# Altium PCB LiPo Charger.pcbdoc
Units mm, origin at the board's own origin, x right, y up, seen from the top; angles counter-clockwise.
Board outline 34.77 x 51.65 mm, 2 copper layers (Top Layer, Bottom Layer); 46 components, 29 nets, 164 pads, 18 vias.
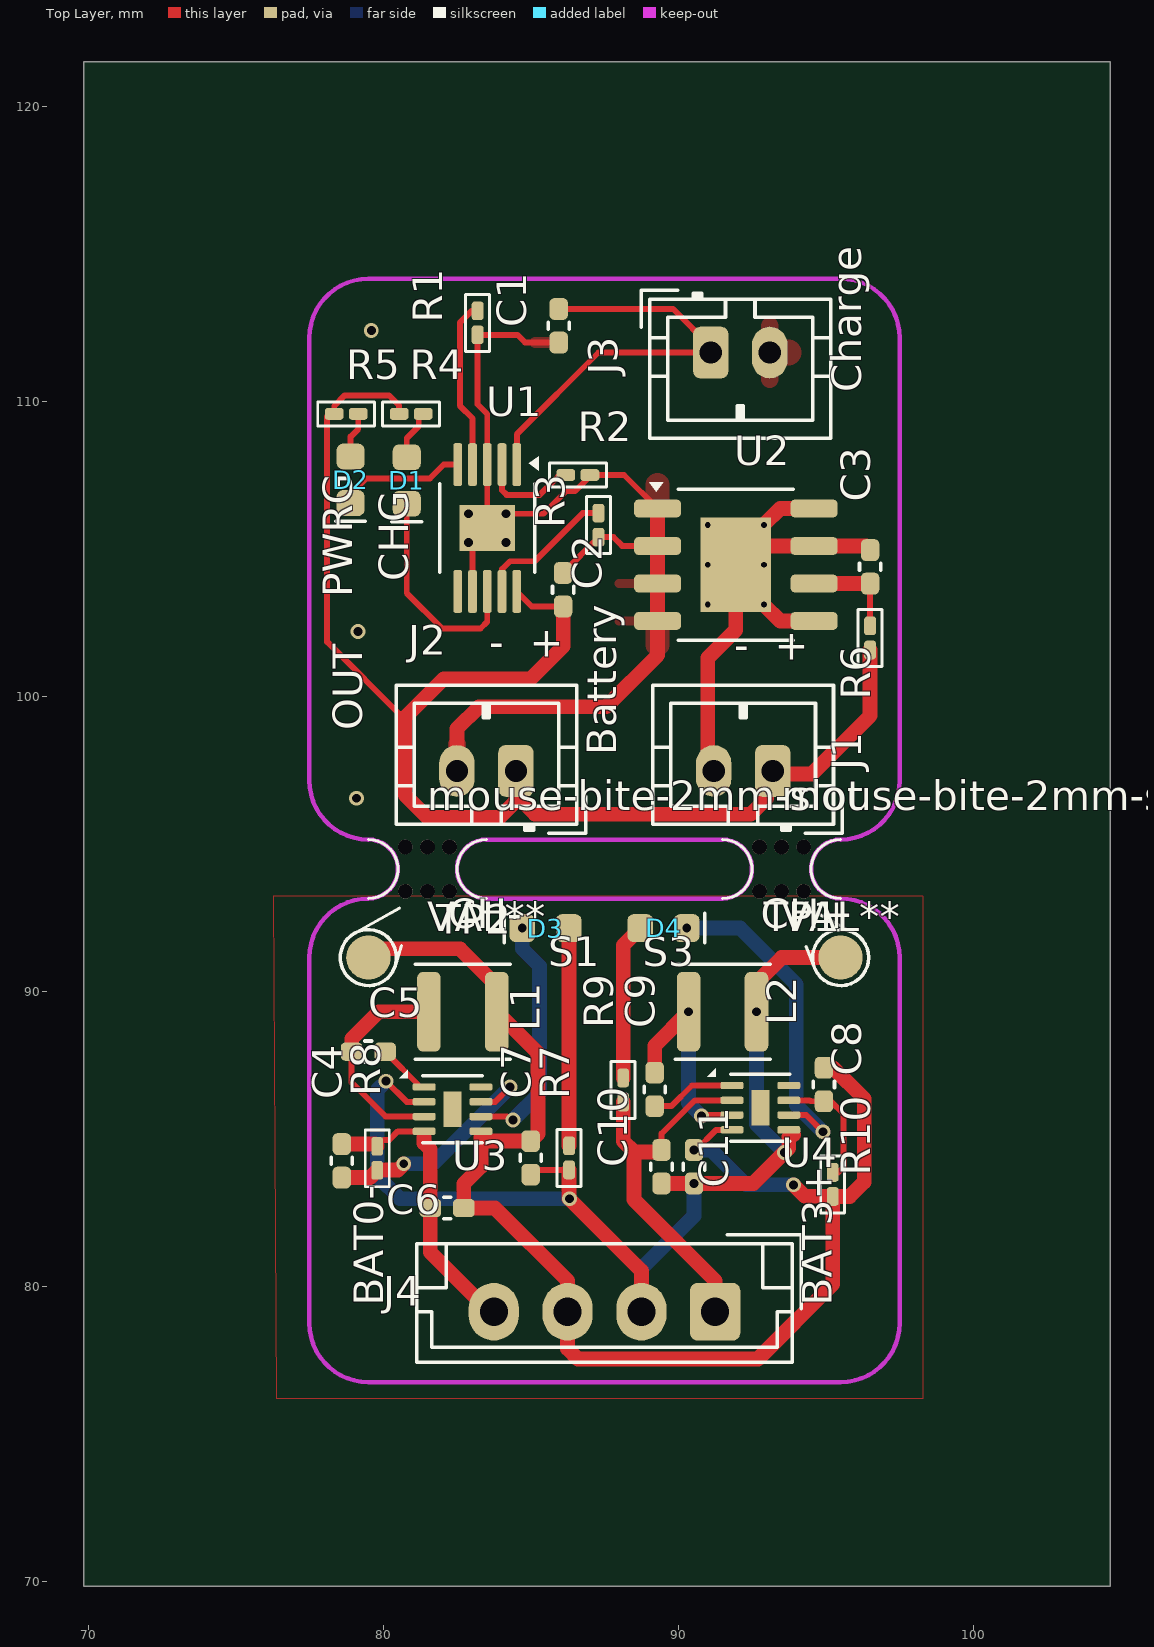
[diagram p0: Top Layer view]
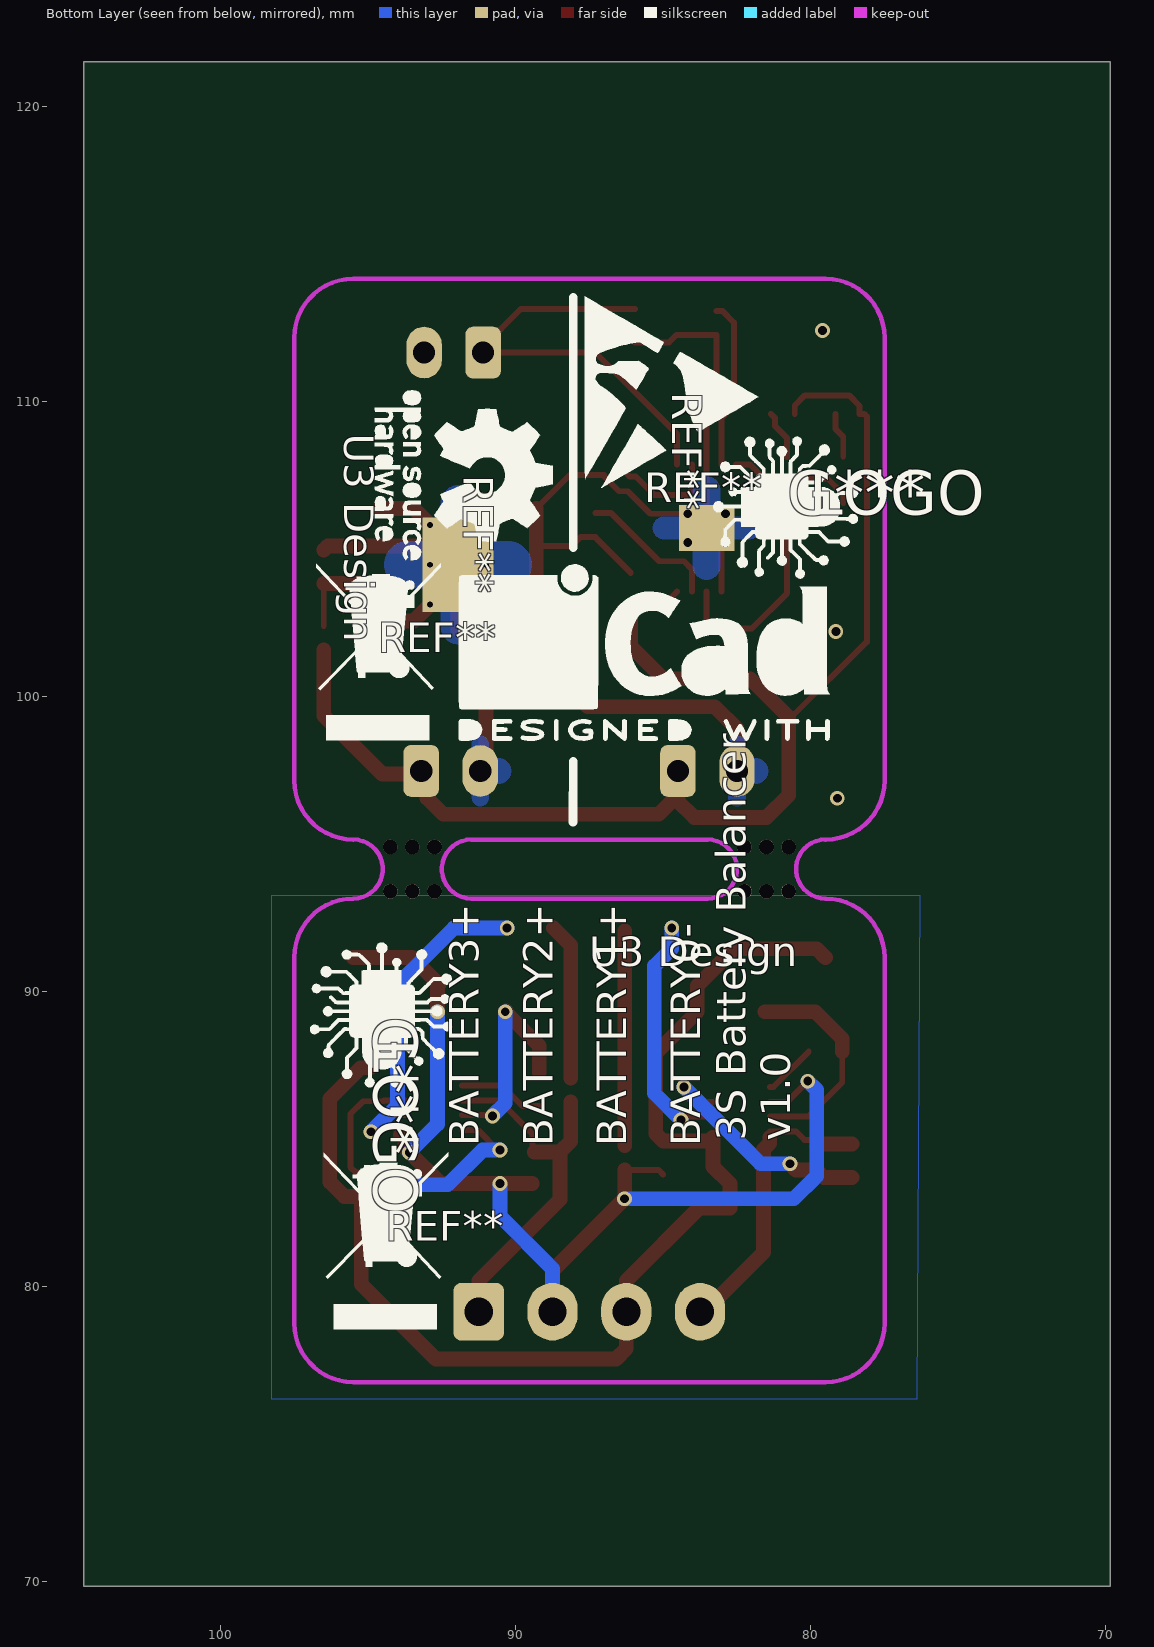
[diagram p1: Bottom Layer view, seen from below]

## Layer stack, top to bottom
Top Layer: signal copper (thickness not stored)
Dielectric: dielectric 0.32, FR-4, Dk 4.8
Bottom Layer: signal copper (thickness not stored)

## Board outline
104.62,69.85 69.85,69.85 69.85,121.497 104.62,121.497

## Design rules (kind name [scope] priority, off if disabled: settings)
BoardOutlineClearance safeClearance [All] p0: genericclearance=0.254 ignorepadtopadclearanceinfootprint=FALSE except(0: Track-CutoutEdge SMDPad-CutoutEdge THPad-CutoutEdge Via-CutoutEdge Fill-CutoutEdge Region-CutoutEdge Arc-SplitContinuation Track-SplitContinuation SMDPad-SplitContinuation THPad-SplitContinuation Via-SplitContinuation Fill-SplitContinuation Poly-SplitContinuation Region-SplitContinuation Text-SplitContinuation; 0.5: Track-OutlineEdge SMDPad-OutlineEdge THPad-OutlineEdge Via-OutlineEdge Fill-OutlineEdge Region-OutlineEdge Poly-OutlineEdge Text-OutlineEdge)
Clearance safeClearance [(InNet('GNDD') OR InNet('-BATT') OR InNet('+5V') OR InNet('+BATT') OR InNet('NET-(U2-VDD)') OR InNet('NET-(D1-A)') OR InNet('NET-(D1-K)') OR InNet('NET-(D2-K)') OR InNet('NET-(D2-A)') OR InNet('NET-(U1-PRETERM)') OR InNet('NET-(U1-ISET)') OR InNet('NET-(U1-TS)') OR InNet('NET-(U3-ISET)') OR InNet('NET-(J4-PIN_4)') OR InNet('NET-(U3-SW)') OR InNet('NET-(U3-BATC)') OR InNet('NET-(U4-ISET)') OR InNet('NET-(U4-BATC)') OR InNet('NET-(U4-SW)') OR InNet('NET-(J4-PIN_1)') OR InNet('NET-(D3-A)') OR InNet('NET-(D3-K)') OR InNet('NET-(D4-K)') OR InNet('NET-(D4-A)') OR InNet('NET-(J4-PIN_3)') OR InNet('NET-(J4-PIN_2)') OR InNet('UNCONNECTED-(U1-NC-PAD6)') OR InNet('UNCONNECTED-(U4-EN-PAD8)') OR InNet('UNCONNECTED-(U3-EN-PAD8)'))] p1: gap=0.178 ignorepadtopadclearanceinfootprint=FALSE except(0: Track-Track Track-SMDPad SMDPad-SMDPad Track-THPad SMDPad-THPad THPad-THPad Track-Via SMDPad-Via THPad-Via Via-Via Track-Fill SMDPad-Fill THPad-Fill Via-Fill Fill-Fill Track-Region SMDPad-Region THPad-Region Via-Region Fill-Region Region-Region Track-Poly SMDPad-Poly THPad-Poly Via-Poly Fill-Poly Region-Poly Poly-Poly Track-Text SMDPad-Text THPad-Text Via-Text Fill-Text Region-Text Poly-Text Text-Text Track-Hole SMDPad-Hole THPad-Hole Via-Hole Fill-Hole Region-Hole Poly-Hole Text-Hole; 0.5: Track-Sheet SMDPad-Sheet THPad-Sheet Via-Sheet Fill-Sheet Region-Sheet Poly-Sheet Text-Sheet Sheet-Hole)
DiffPairsRouting differentialPair [All] p1: maxuncoupledlength=10 minlimit=6 maxlimit=6 mostfreqgap=6 toplayer_minwidth=5 toplayer_prefwidth=10 toplayer_maxwidth=100 bottomlayer_minwidth=5 bottomlayer_prefwidth=10 bottomlayer_maxwidth=100
PasteMaskExpansion Common [All] p1: expansion=0
PlaneConnect innerPlane [All] p1: planeconnectstyle=Relief reliefexpansion=0.508 reliefentries=4 reliefconductorwidth=0.254 reliefairgap=0.254
PolygonConnect CopperRegion [All] p1: connectstyle=Relief reliefentries=4 reliefconductorwidth=0 polygonreliefangle="90 Angle" airgapwidth=19.685
PolygonConnect CopperRegion1 [All] p1: connectstyle=Relief reliefentries=4 reliefconductorwidth=0 polygonreliefangle="90 Angle" airgapwidth=19.685
PolygonConnect CopperRegion2 [All] p1: connectstyle=Relief reliefentries=4 reliefconductorwidth=0 polygonreliefangle="90 Angle" airgapwidth=19.685
RoutingVias viaSize [All] p1: viastyle="Through Hole" holewidth=12.0078 minholewidth=11.811 maxholewidth=236.2204 width=24.0158 minwidth=19.685 maxwidth=393.7008
SolderMaskExpansion Common [All] p1: useseparateexpansions=TRUE expansion=0 expansionbottom=0
Width trackWidth [All] p1: maxlimit=100 minlimit=5 preferedwidth=10

## Components (designator, comment, footprint, x,y, rotation, side; value= is the part's Value field where it differs from the comment)
C1 "10uF" Capacitor_SMD:C_0402_1005Metric_Pad0.74x0.62mm_HandSolder 85.94,112.555 r270 top
C2 "10uF" Capacitor_SMD:C_0402_1005Metric_Pad0.74x0.62mm_HandSolder 86.089,103.612 r90 top
C3 "10uF" Capacitor_SMD:C_0402_1005Metric_Pad0.74x0.62mm_HandSolder 96.49,104.387 r90 top
C4 "1nF" Capacitor_SMD:C_0402_1005Metric_Pad0.74x0.62mm_HandSolder 78.59,84.261 r90 top
C5 "10nF" Capacitor_SMD:C_0402_1005Metric_Pad0.74x0.62mm_HandSolder 79.49,87.961 r0 top
C6 "10uF" Capacitor_SMD:C_0402_1005Metric_Pad0.74x0.62mm_HandSolder 82.158,82.661 r0 top
C7 "10uF" Capacitor_SMD:C_0402_1005Metric_Pad0.74x0.62mm_HandSolder 84.99,84.361 r270 top
C8 "1nF" Capacitor_SMD:C_0402_1005Metric_Pad0.74x0.62mm_HandSolder 94.924,86.847 r90 top
C9 "10nF" Capacitor_SMD:C_0402_1005Metric_Pad0.74x0.62mm_HandSolder 89.19,86.679 r270 top
C10 "10uF" Capacitor_SMD:C_0402_1005Metric_Pad0.74x0.62mm_HandSolder 89.424,84.061 r90 top
C11 "10uF" Capacitor_SMD:C_0402_1005Metric_Pad0.74x0.62mm_HandSolder 90.524,84.061 r270 top
D1 "Red" SparkFun-LED:LED_0603_1608Metric_Red 80.79,107.312 r90 top
D2 "Green" SparkFun-LED:LED_0603_1608Metric_Green 78.89,107.334 r90 top
D3 "Red" SparkFun-LED:LED_0603_1608Metric_Red 85.49,92.147 r0 top
D4 "Red" SparkFun-LED:LED_0603_1608Metric_Red 89.49,92.147 r180 top
G*** "LOGO" LOGO 80.786,106.155 r180 bottom
G*** "LOGO" LOGO 94.79,89.147 r270 bottom
J1 "Battery_conn_in" Connector_JST:JST_PH_B2B-PH-K_1x02_P2.00mm_Vertical 93.19,97.471 r180 top
J2 "Battery_conn_out" Connector_JST:JST_PH_B2B-PH-K_1x02_P2.00mm_Vertical 84.49,97.471 r180 top
J3 "Charger_conn" Connector_JST:JST_PH_B2B-PH-K_1x02_P2.00mm_Vertical 91.09,111.647 r0 top
J4 "Conn_01x04_batteries" Connector_JST:JST_EH_B4B-EH-A_1x04_P2.50mm_Vertical 91.24,79.147 r180 top
L1 "1uH" Inductor_SMD:L_Sunlord_SWPA3010S 82.69,89.311 r0 top
L2 "1uH" Inductor_SMD:L_Sunlord_SWPA3010S 91.49,89.311 r0 top
mouse-bite-2mm-slot "VAL**" MouseBites:mouse-bite-2mm-slot 93.49,94.147 r0 top
mouse-bite-2mm-slot "VAL**" MouseBites:mouse-bite-2mm-slot 81.49,94.147 r0 top
R1 "1k" PCM_Resistor_SMD_AKL:R_0201_0603Metric_Pad0.64x0.40mm_HandSolder 83.19,112.654 r270 top
R2 "536R" PCM_Resistor_SMD_AKL:R_0201_0603Metric_Pad0.64x0.40mm_HandSolder 86.589,107.499 r0 top
R3 "10k" PCM_Resistor_SMD_AKL:R_0201_0603Metric_Pad0.64x0.40mm_HandSolder 87.289,105.799 r270 top
R4 "1k5" PCM_Resistor_SMD_AKL:R_0201_0603Metric_Pad0.64x0.40mm_HandSolder 80.94,109.57 r0 top
R5 "1k5" PCM_Resistor_SMD_AKL:R_0201_0603Metric_Pad0.64x0.40mm_HandSolder 78.74,109.57 r0 top
R6 "1k" PCM_Resistor_SMD_AKL:R_0201_0603Metric_Pad0.64x0.40mm_HandSolder 96.49,101.979 r270 top
R7 "1k5" PCM_Resistor_SMD_AKL:R_0201_0603Metric_Pad0.64x0.40mm_HandSolder 86.29,84.361 r90 top
R8 "51K" PCM_Resistor_SMD_AKL:R_0201_0603Metric_Pad0.64x0.40mm_HandSolder 79.79,84.347 r90 top
R9 "1k5" PCM_Resistor_SMD_AKL:R_0201_0603Metric_Pad0.64x0.40mm_HandSolder 88.124,86.661 r90 top
R10 "51K" PCM_Resistor_SMD_AKL:R_0201_0603Metric_Pad0.64x0.40mm_HandSolder 95.224,83.461 r270 top
REF** "KiCad-Logo2_5mm_SilkScreen" Symbol:KiCad-Logo2_5mm_SilkScreen 85.64,101.497 r180 bottom
REF** "WEEE-Logo_4.2x6mm_SilkScreen" Symbol:WEEE-Logo_4.2x6mm_SilkScreen 94.64,101.497 r180 bottom
REF** "WEEE-Logo_4.2x6mm_SilkScreen" Symbol:WEEE-Logo_4.2x6mm_SilkScreen 94.39,81.547 r180 bottom
REF** "OSHW-Logo_5.7x6mm_SilkScreen" Symbol:OSHW-Logo_5.7x6mm_SilkScreen 91.74,107.497 r270 bottom
REF** "ESD-Logo_6.6x6mm_SilkScreen" Symbol:ESD-Logo_6.6x6mm_SilkScreen 84.69,110.297 r270 bottom
TP1 "TestPoint" TestPoint:TestPoint_Pad_D1.5mm 95.49,91.147 r0 top
TP2 "TestPoint" TestPoint:TestPoint_Pad_D1.5mm 79.49,91.147 r0 top
U1 "BQ24090DGQ" Package_SO:HVSSOP-10-1EP_3x3mm_P0.5mm_EP1.57x1.88mm_ThermalVias 83.519,105.702 r270 top
U2 "XB8089D" Package_SO:HTSOP-8-1EP_3.9x4.9mm_P1.27mm_EP2.4x3.2mm_ThermalVias 91.94,104.458 r0 top
U3 "ETA3000" Package_DFN_QFN:DFN-8-1EP_2x2mm_P0.5mm_EP0.6x1.2mm 82.34,86.011 r0 top
U4 "ETA3000" Package_DFN_QFN:DFN-8-1EP_2x2mm_P0.5mm_EP0.6x1.2mm 92.774,86.061 r0 top

## Footprints (in the part's own frame and the unit in brackets; to place one, negate y for a bottom-side part, rotate by r counter-clockwise, add the part's x,y. Pads: shape width x height; smd on the part's side, far side on the other; paste and mask are expansions set on the pad)
Capacitor_SMD:C_0402_1005Metric_Pad0.74x0.62mm_HandSolder [mm]
  rrect50% 0.735x0.62 smd: 1(-0.567,0) 2(0.567,0)
  silkscreen extent -0.12,-0.36 0.12,0.36
Connector_JST:JST_EH_B4B-EH-A_1x04_P2.50mm_Vertical [mm]
  rrect29% 1.7x1.95 hole 0.95: 1(0,0)
  oval 1.7x1.95 hole 0.95: 2(2.5,0) 3(5,0) 4(7.5,0)
  silkscreen extent -2.91,-2.61 10.11,1.71
Connector_JST:JST_PH_B2B-PH-K_1x02_P2.00mm_Vertical [mm]
  rrect41% 1.2x1.75 hole 0.75: 1(0,0)
  oval 1.2x1.75 hole 0.75: 2(2,0)
  silkscreen extent -2.36,-2.91 4.06,2.11
Inductor_SMD:L_Sunlord_SWPA3010S [mm]
  rrect50% 0.8x2.7 smd: 1(-1.15,0) 2(1.15,0)
  silkscreen extent -1.61,-1.61 1.61,1.61
LOGO [mm]
  silkscreen extent -2.51,-2.17 2.4,2.65
MouseBites:mouse-bite-2mm-slot [mm]
  round 0.5 hole 0.5 unplated: ""(-0.75,-0.75) ""(-0.75,0.75) ""(0,-0.75) ""(0,0.75) ""(0.75,-0.75) ""(0.75,0.75)
  silkscreen extent -2,-1 2,1
Package_DFN_QFN:DFN-8-1EP_2x2mm_P0.5mm_EP0.6x1.2mm [mm]
  rrect50% 0.775x0.25 smd: 1(-0.962,0.75) 2(-0.962,0.25) 3(-0.962,-0.25) 4(-0.962,-0.75) 5(0.962,-0.75) 6(0.962,-0.25) 7(0.962,0.25) 8(0.962,0.75)
  rect 0.6x1.2 smd: 9(0,0)
  rrect50% 0.24x0.48 smd: ""(-0.15,-0.3) ""(-0.15,0.3) ""(0.15,-0.3) ""(0.15,0.3)
  silkscreen extent -1.8,-1.13 1,1.33
Package_SO:HTSOP-8-1EP_3.9x4.9mm_P1.27mm_EP2.4x3.2mm_ThermalVias [mm]
  rrect50% 1.6x0.6 smd: 1(-2.65,1.905) 2(-2.65,0.635) 3(-2.65,-0.635) 4(-2.65,-1.905) 5(2.65,-1.905) 6(2.65,-0.635) 7(2.65,0.635) 8(2.65,1.905)
  round 0.5 hole 0.2: 9(-0.95,-1.35) 9(-0.95,0) 9(-0.95,1.35) 9(0.95,-1.35) 9(0.95,0) 9(0.95,1.35)
  rect 2.4x3.2 smd: 9(0,0)
  rect 2.4x3.2 smd far side: 9(0,0)
  rrect50% 0.97x1.29 smd: ""(-0.6,-0.8) ""(-0.6,0.8) ""(0.6,-0.8) ""(0.6,0.8)
  silkscreen extent -2.94,-2.56 1.95,2.8
Package_SO:HVSSOP-10-1EP_3x3mm_P0.5mm_EP1.57x1.88mm_ThermalVias [mm]
  rrect50% 1.45x0.3 smd: 1(-2.15,1) 2(-2.15,0.5) 3(-2.15,0) 4(-2.15,-0.5) 5(-2.15,-1) 6(2.15,-1) 7(2.15,-0.5) 8(2.15,0) 9(2.15,0.5) 10(2.15,1)
  round 0.6 hole 0.3: 11(-0.485,0.64) 11(-0.485,-0.64) 11(0.485,0.64) 11(0.485,-0.64)
  rect 1.57x1.88 smd: 11(0,0)
  rect 1.57x1.88 smd far side: 11(0,0)
  rrect50% 0.63x0.76 smd: ""(-0.39,0.47) ""(-0.39,-0.47) ""(0.39,0.47) ""(0.39,-0.47)
  silkscreen extent -2.43,-1.61 1.5,1.74
PCM_Resistor_SMD_AKL:R_0201_0603Metric_Pad0.64x0.40mm_HandSolder [mm]
  rrect50% 0.635x0.4 smd: 1(-0.407,0) 2(0.407,0)
  rrect50% 0.458x0.36 smd: ""(-0.433,0) ""(0.433,0)
  silkscreen extent -0.97,-0.41 0.97,0.41
SparkFun-LED:LED_0603_1608Metric_Green [mm]
  rrect50% 0.875x0.95 smd: 1(-0.787,0) 2(0.787,0)
  silkscreen extent -1.4,-0.5 -1.4,0.5
SparkFun-LED:LED_0603_1608Metric_Red [mm]
  rrect50% 0.875x0.95 smd: 1(-0.787,0) 2(0.787,0)
  silkscreen extent -1.4,-0.5 -1.4,0.5
Symbol:ESD-Logo_6.6x6mm_SilkScreen [mm]
  silkscreen extent -3.25,-2.96 3.23,2.93
Symbol:KiCad-Logo2_5mm_SilkScreen [mm]
  silkscreen extent -6.28,-3 6.29,2.98
Symbol:OSHW-Logo_5.7x6mm_SilkScreen [mm]
  silkscreen extent -2.87,-3.02 2.88,3.01
Symbol:WEEE-Logo_4.2x6mm_SilkScreen [mm]
  silkscreen extent -2.11,-2.99 2.12,3.01
TestPoint:TestPoint_Pad_D1.5mm [mm]
  round 1.5 smd: 1(0,0)
  silkscreen extent -0.95,-0.95 0.95,0.95

## Via types
v1: diameter 0.5, hole 0.3, Top Layer to Bottom Layer, 18 vias

## Nets (pads, with @x,y where several pads share a name; then routed paths per layer and width w, separated by ;. In a path a pad name is that pad's centre, name@x,y a point inside that pad or via, vN(x,y) a via of type N, cw(c..) or ccw(c..) an arc to the next point about the centre after c; other vN are vias at no path point)
+5V: C1.1 J3.1 U1.1 | length 14.6
  Top Layer w0.2: U1.1 84.519,108.876 87.29,111.647 J3.1 91.09,111.847 89.815,113.122 C1.1
+BATT: C2.1 J1.1 J2.1 R4.1 R5.1 R6.2 U1.10 | length 49.3
  Top Layer w0.2: R4.1 80.532,109.854 80.19,110.197 78.69,110.197 78.332,109.839 R5.1 78.183,109.57 78.091,109.478 78.091,101.846 80.64,99.297 80.74,99.297 ; U1.10 85.027,103.044 C2.1
  Top Layer w0.5: C2.1 86.089,101.696 84.99,100.597 82.04,100.597 80.74,99.297 80.74,96.647 81.489,95.898 83.941,95.898 84.49,96.447 J2.1 84.49,96.65 85.139,96.001 92.446,96.001 92.99,96.545 92.99,97.271 J1.1 93.294,97.368 94.511,97.368 96.49,99.347 R6.2
-BATT: C3.2 J1.2 U2.5 U2.7 U2.8 U2.9 | length 16.2
  Top Layer w0.5: J1.2 90.99,97.671 90.99,101.297 91.94,102.247 91.94,104.458 92.575,105.093 U2.7 96.352,105.093 C3.2 ; U2.9@92.89,103.108 93.445,102.553 U2.5 ; U2.9@92.89,105.808 93.445,106.363 U2.8
GNDD: C1.2 C2.2 J2.2 J3.2 R1.2 R2.2 R3.2 U1.3 U1.7 U1.11 U2.1 U2.2 U2.3 U2.4 | length 36.1
  Top Layer w0.2: U1.7 83.019,105.077 83.519,105.577 83.519,105.702 U1.3 83.519,109.568 83.19,109.897 R1.2 84.54,112.247 84.8,111.987 C1.2 ; U1.11@84.159,106.187 85.427,106.187 86.189,106.949 86.489,106.949 86.997,107.457 R2.2 88.154,107.499 U2.1 ; C2.2 86.089,104.192 R3.2 87.796,105.392 88.09,105.097 89.286,105.097 U2.2
  Top Layer w0.5: J2.2 82.49,98.897 83.24,99.647 87.54,99.647 89.29,101.397 U2.4 U2.1
  other v1: 79.09,96.547 79.14,102.197 79.59,112.397
NET-(D1-A): D1.2 R4.2 | length 1.7
  Top Layer w0.2: D1.2 80.79,108.747 81.198,109.154 81.198,109.42 R4.2
NET-(D1-K): D1.1 U1.8 | length 7.4
  Top Layer w0.2: D1.1 80.79,103.497 81.99,102.297 83.29,102.297 83.519,102.526 U1.8
NET-(D2-A): D2.2 R5.2 | length 1.6
  Top Layer w0.2: D2.2 78.89,108.797 79.147,109.054 R5.2
NET-(D2-K): D2.1 U1.5 | length 4.3
  Top Layer w0.2: D2.1 78.89,106.847 79.424,107.381 81.574,107.381 82.045,107.852 U1.5
NET-(D3-A): D3.2 R7.2 | length 7.4
  Top Layer w0.2: D3.2 86.278,92.072 D3.2@86.29,92.059
  Top Layer w0.5: R7.2 D3.2@86.29,92.059
NET-(D3-K): D3.1 U3.6 | length 8.3
  Top Layer w0.2: U3.6 84.19,85.761 84.304,85.647 v1(84.39,85.647)
  Bottom Layer w0.5: v1(84.39,85.647) 85.29,86.547 85.29,90.859 84.703,91.447 v1(84.703,92.147)
NET-(D4-A): D4.2 R9.2 | length 5.3
  Top Layer w0.5: R9.2 88.124,91.568 D4.2
NET-(D4-K): D4.1 U4.6 | length 11.3
  Top Layer w0.2: U4.6 94.326,85.811 v1(94.89,85.247)
  Bottom Layer w0.5: v1(90.278,92.147) 92.09,92.147 93.99,90.247 93.99,86.147 v1(94.89,85.247)
NET-(J4-PIN_1): C10.2 J4.1 R9.1 U4.2 | length 12.8
  Top Layer w0.2: C10.2@89.356,84.561 C10.2 89.424,85.18 90.555,86.311 U4.2
  Top Layer w0.5: R9.1 88.124,84.928 88.49,84.561 ; C10.2@89.356,84.561 88.49,84.561 ; J4.1 91.24,80.197 88.49,82.947 88.49,84.561
NET-(J4-PIN_2): C7.2 C10.1 C11.2 J4.2 L2.2 R7.1 TP1.1 U3.2 U4.5 | length 38.8
  Top Layer w0.2: v1(80.09,86.96) 80.79,86.261 U3.2 ; C7.2 85.15,83.954 R7.1 ; v1@86.29,82.986 v1(86.303,82.974)
  Top Layer w0.5: v1@86.29,82.986 R7.1 ; v1(86.303,82.974) 88.74,80.536 J4.2 ; C10.1 v1(90.524,83.494) 92.537,83.494 v1(93.59,84.547) 93.736,84.693 93.736,85.067 93.817,85.147 93.89,85.147 ; v1(92.64,89.311) 92.64,90.197 92.59,90.247 93.49,91.147 TP1.1
  Bottom Layer w0.2: v1@90.49,83.46 v1(90.524,83.494)
  Bottom Layer w0.5: v1(80.09,86.96) 79.79,86.66 79.79,83.747 80.564,82.974 v1(86.303,82.974) ; J4.2 88.74,80.611 90.524,82.394 v1@90.524,83.427 ; v1(92.64,89.311) 92.64,85.497 v1(93.59,84.547)
NET-(J4-PIN_3): C6.2 C7.1 C8.2 C11.1 J4.3 L1.2 R10.2 TP2.1 U3.5 U4.4 | length 48.6
  Top Layer w0.2: J4.3 J4.3@86.24,79.611 ; v1(90.524,84.629) 90.591,84.629 91.274,85.311 U4.4 ; R10.2@95.214,83.064 R10.2
  Top Layer w0.5: TP2.1 79.79,91.447 82.59,91.447 83.84,90.197 L1.2 85.24,87.911 85.24,85.179 C7.1 83.435,84.929 83.303,85.061 83.303,84.059 82.725,83.482 C6.2 83.776,82.661 86.24,80.197 J4.3 86.24,77.897 86.59,77.547 92.69,77.547 95.224,80.08 R10.2 95.797,83.054 96.29,83.547 96.29,86.358 95.234,87.414 C8.2 ; v1(93.89,83.447) 94.274,83.064 R10.2@95.214,83.064
  Bottom Layer w0.5: v1(90.524,84.629) 91.109,84.629 92.29,83.447 v1(93.89,83.447)
NET-(J4-PIN_4): C4.2 C6.1 J4.4 R8.2 U3.4 | length 10.4
  Top Layer w0.2: R8.2@79.783,84.961 79.79,84.954 R8.2 80.004,84.968 80.198,84.968 80.49,85.261 U3.4 81.378,85.047
  Top Layer w0.5: C4.2 79.716,84.829 R8.2 ; 81.378,85.047 81.378,84.859 81.59,84.647 C6.1 81.59,81.161 J4.4@83.605,79.147 ; J4.4@83.673,79.147 J4.4@83.808,79.147
NET-(U1-ISET): R2.1 U1.2 | length 3.4
  Top Layer w0.2: U1.2 84.019,106.982 84.175,106.826 85.296,106.826 85.919,107.449 86.132,107.449 R2.1
NET-(U1-PRETERM): R1.1 U1.4 | length 5.8
  Top Layer w0.2: U1.4 83.019,109.418 82.59,109.847 82.59,112.662 82.99,113.062 R1.1
NET-(U1-TS): R3.1 U1.9 | length 4.8
  Top Layer w0.2: U1.9 84.019,104.31 84.286,104.578 85.126,104.578 86.755,106.207 R3.1
NET-(U2-VDD): C3.1 R6.1 U2.6 | length 3.3
  Top Layer w0.2: R6.1 C3.1
  Top Layer w0.5: U2.6 96.487,103.823 C3.1
NET-(U3-BATC): C5.2 U3.1 | length 1.8
  Top Layer w0.2: C5.2 81.258,86.761 U3.1
NET-(U3-ISET): C4.1 R8.1 U3.7 | length 8.2
  Top Layer w0.2: v1@80.682,84.153 v1(80.69,84.161) ; U3.7 83.79,86.261 v1(84.29,86.761)
  Top Layer w0.5: C4.1 79.545,83.694 R8.1 79.798,83.947 80.49,83.947 80.682,84.139 v1@80.682,84.153
  Bottom Layer w0.5: v1(80.69,84.161) 81.69,84.161 v1(84.29,86.761)
NET-(U3-SW): C5.1 L1.1 U3.3 | length 7.4
  Top Layer w0.2: C5.1 78.923,86.914 80.077,85.761 U3.3
  Top Layer w0.5: C5.1 78.923,88.394 79.84,89.311 L1.1
NET-(U4-BATC): C9.2 U4.1 | length 2.9
  Top Layer w0.2: C9.2 89.755,86.112 90.455,86.811 U4.1
NET-(U4-ISET): C8.1 R10.1 U4.7 | length 4.3
  Top Layer w0.2: U4.7 94.441,86.311 94.473,86.279 C8.1 95.158,86.279 95.59,85.847 95.59,84.047 95.412,83.869 R10.1
NET-(U4-SW): C9.1 L2.1 U4.3 | length 7.3
  Top Layer w0.2: v1(90.774,85.781) 90.804,85.811 U4.3
  Top Layer w0.5: C9.1 89.19,88.161 L2.1@90.304,89.274 ; L2.1@90.304,89.347 v1(90.34,89.311)
  Bottom Layer w0.5: v1(90.34,89.311) 90.34,86.214 v1(90.774,85.781)
UNCONNECTED-(U1-NC-PAD6): U1.6
UNCONNECTED-(U3-EN-PAD8): U3.8
UNCONNECTED-(U4-EN-PAD8): U4.8
pads on no net: mouse-bite-2mm-slot. R1. R2. R3. R4. R5. R6. R7. R8. R9. R10. U1. U2. U3. U3.9 U4. U4.9

## Polygon pours and split planes (outlines as drawn)
-BATT on Bottom Layer (solid, remove dead copper, pour order 4): 88.29,115.147 98.19,115.147 98.19,95.097 88.29,95.097
GNDD on Bottom Layer (solid, remove dead copper, pour order 6): 76.99,115.147 87.89,115.147 87.89,95.097 76.99,95.097
no net on Top Layer (solid, remove dead copper, pour order 0): 76.28,93.25 98.27,93.25 98.27,76.2 76.388,76.2
no net on Bottom Layer (solid, remove dead copper, pour order 8): 76.28,93.25 98.27,93.25 98.27,76.2 76.388,76.2
GNDD on Top Layer (solid, remove dead copper, pour order 2): 76.2,114.647 98.19,114.647 98.19,95.097 76.325,95.097

## Keep-outs
Board Outline Layer:
  lines w0.15: 77.49,78.761 ccw(c79.49,78.761) 79.49,76.761 95.49,76.761 ccw(c95.49,78.761) 97.49,78.761 97.49,91.147 ccw(c95.49,91.147) 95.49,93.147 cw(c95.49,94.147) 95.49,95.147 ccw(c95.49,97.147) 97.49,97.147 97.49,112.147 ccw(c95.49,112.147) 95.49,114.147 79.49,114.147 ccw(c79.49,112.147) 77.49,112.147 77.49,97.147 ccw(c79.49,97.147) 79.49,95.147 cw(c79.49,94.147) 79.49,93.147 ccw(c79.49,91.147) 77.49,91.147 77.49,78.761 ; 83.49,93.147 cw(c83.49,94.147) 83.49,95.147 91.49,95.147 cw(c91.49,94.147) 91.49,93.147 83.49,93.147

## Silkscreen, mask and mechanical layers (free items; w line width, h text height)
Top Silkscreen Layer:
  lines w0.1: 78.96,91.937 80.55,92.827 ; 80.39,90.817 80.61,91.557 ; 94.32,91.527 94.64,90.717 ; 94.37,92.827 96.05,91.917
  text "Charge" at 96.19,110.297 h1 r90
  text "CHG" at 80.84,103.897 h1 r90
  text "PWRG" at 78.94,103.349 h1 r90
  text "-  +" at 83.59,101.347 h1
  text "-  +" at 91.89,101.247 h1
  text "OUT" at 79.29,98.847 h1 r90
  text "Battery" at 87.89,97.997 h1 r90
  text "CH-" at 82.19,92.147 h1
  text "CH+" at 92.79,92.147 h1
  text "S1" at 85.59,90.847 h1
  text "S3" at 88.79,90.847 h1
  text "BAT0-" at 79.99,79.347 h1 r90
  text "BAT3+" at 95.19,79.347 h1 r90
Bottom Silkscreen Layer:
  lines w0.3: 88.039,113.507 88.04,105.035 ; 88.04,97.797 88.041,95.747
  text "U3 Design" at 95.79,108.897 h1 r90
  text "U3 Design" at 87.49,90.847 h1
  text "3S Battery Balancer / v1.0" at 80.69,84.947 h1 r270
  text "BATTERY0-" at 83.74,84.747 h1 r270
  text "BATTERY1+" at 86.24,84.747 h1 r270
  text "BATTERY2+" at 88.74,84.747 h1 r270
  text "BATTERY3+" at 91.24,84.747 h1 r270